# Altium PCB NB3000XN.PcbDoc (part 4 of 71)
Units mil, origin at the board's own origin, x right, y up, seen from the top; angles counter-clockwise.
Board outline 9527.56 x 6929.77 mil, 6 copper layers (Top Layer, GND+SHIELD, MidLayer1, MidLayer2, P2 - 3V3+5V0, Bottom Layer), stack 62.375 mil thick; 832 components, 1027 nets, 4655 pads, 4981 vias.
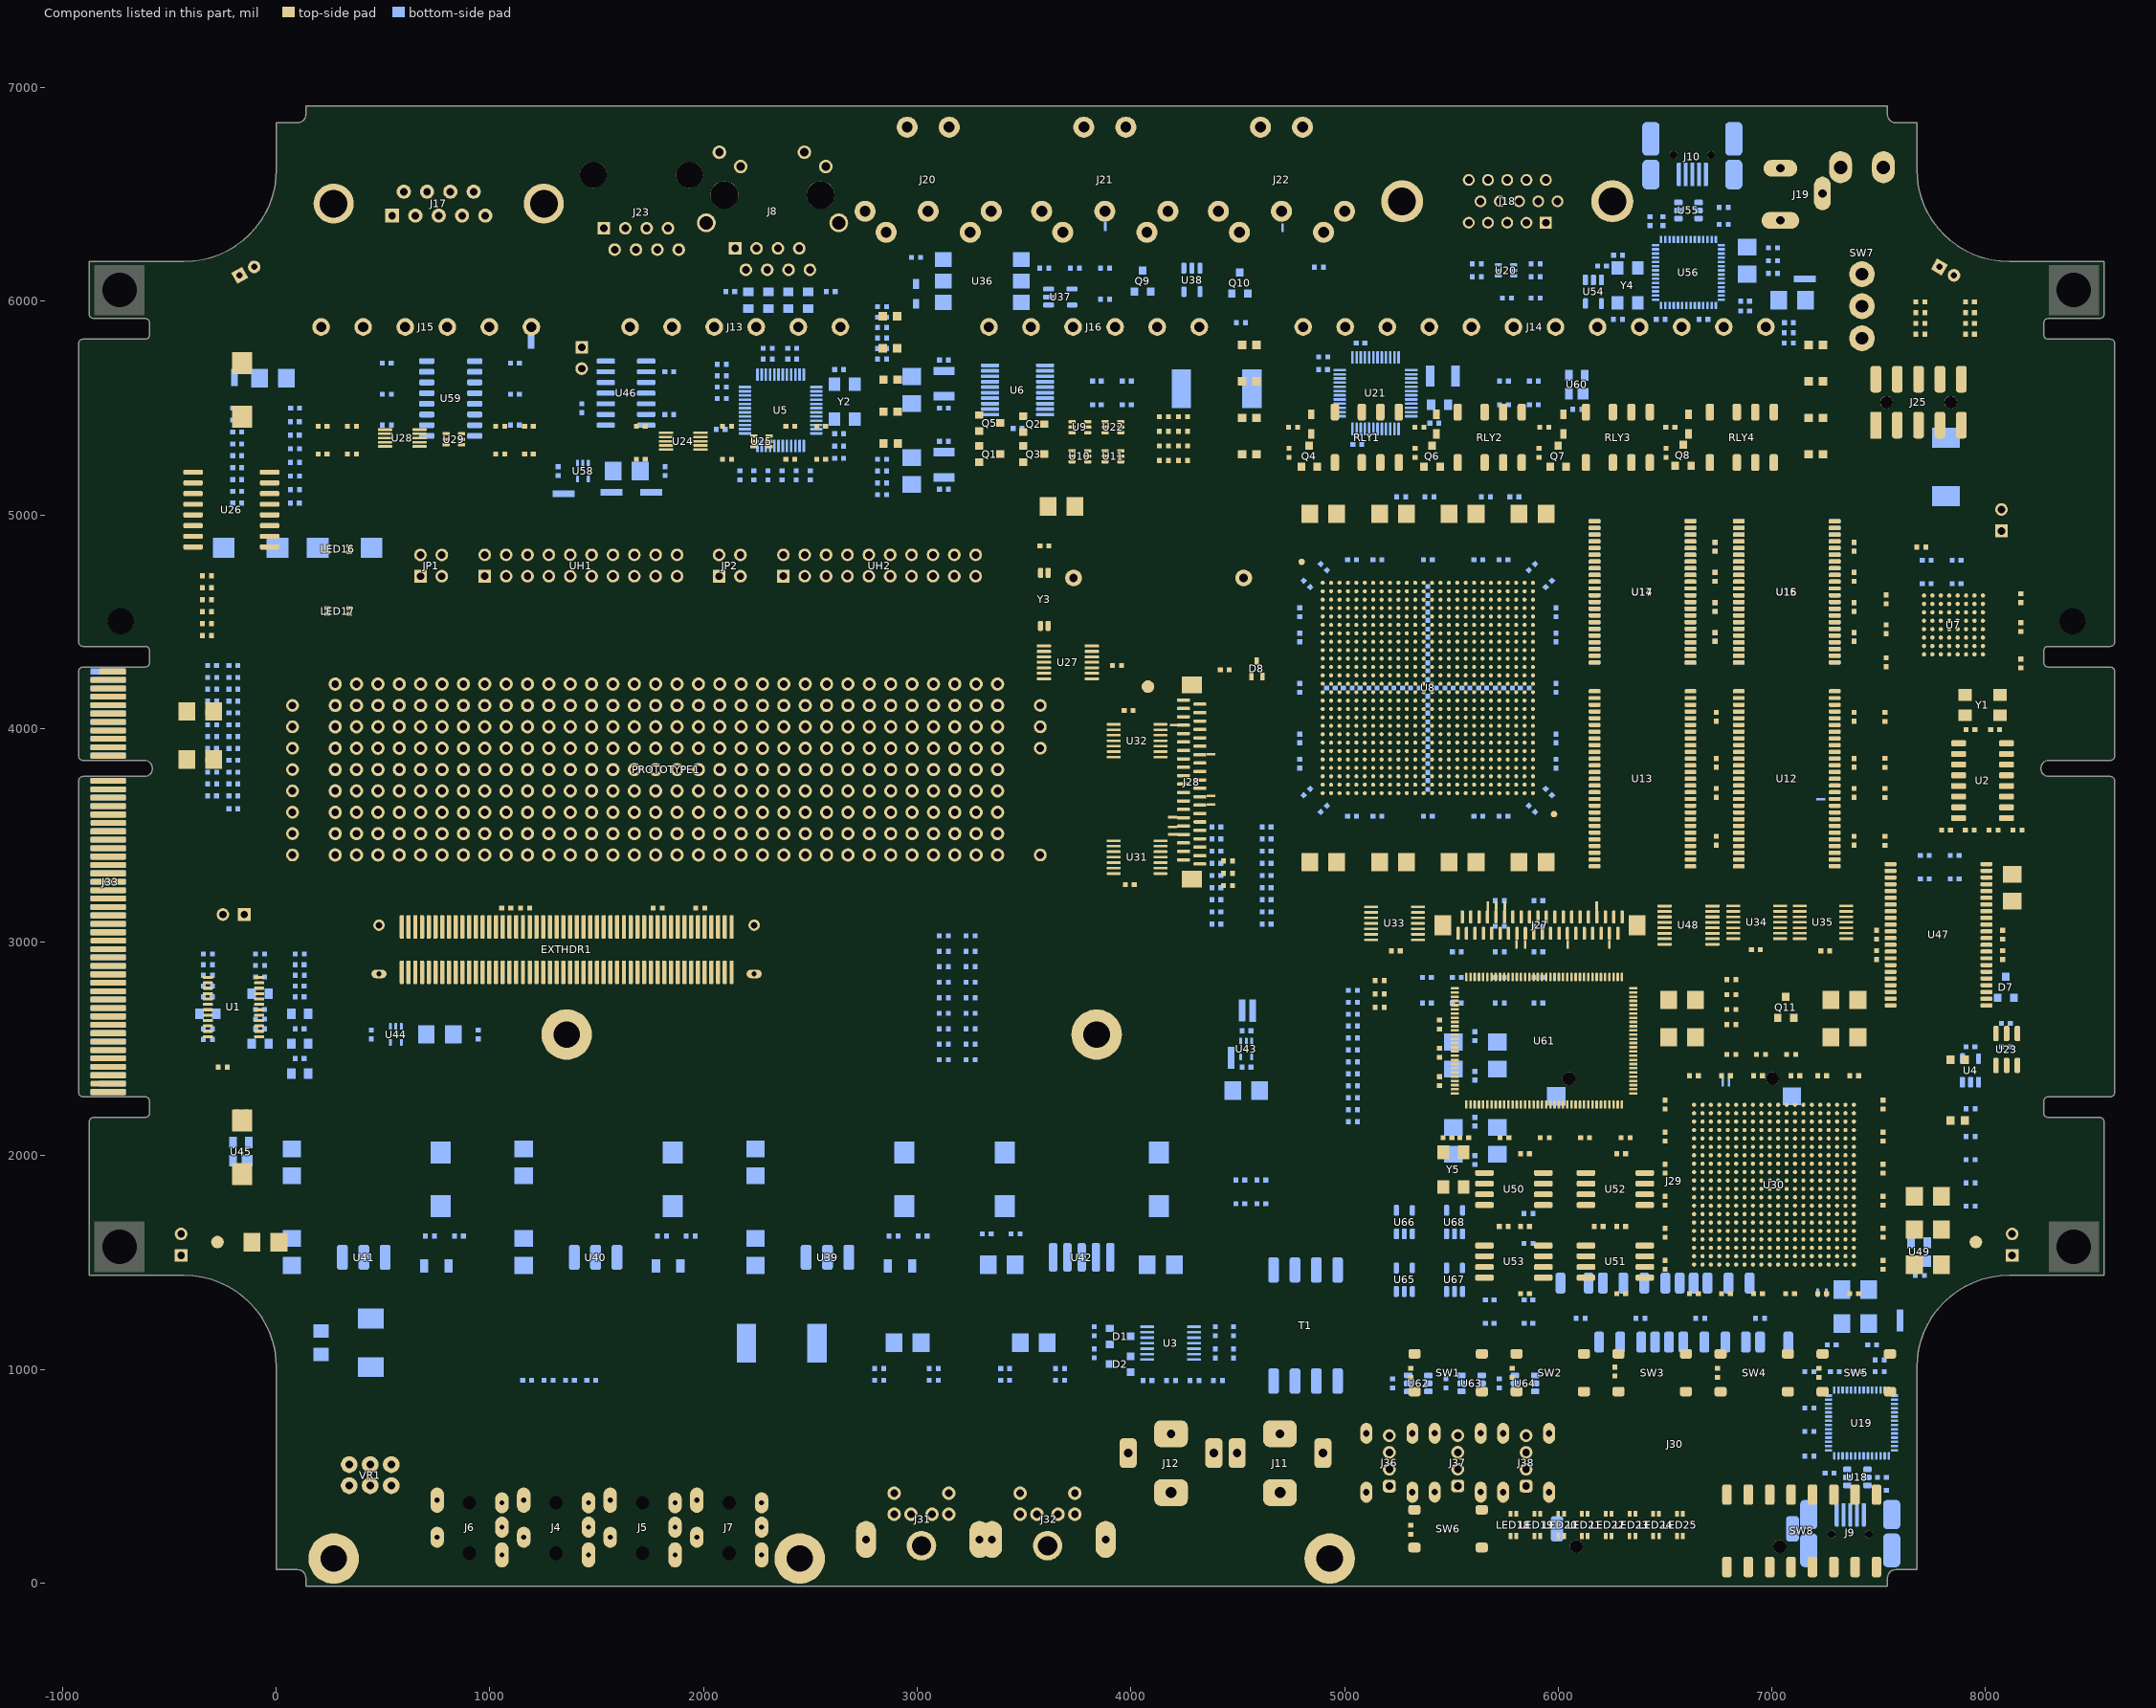
[diagram p8: the components of this part, seen from the top]

## Footprints (in the part's own frame and the unit in brackets; to place one, negate y for a bottom-side part, rotate by r counter-clockwise, add the part's x,y. Pads: shape width x height; smd on the part's side, far side on the other; paste and mask are expansions set on the pad) (continued)
S1204RGBSDJC [mm]
  rect 0.7x0.45 smd paste-1 mask+0: 1(1.313,-0.345)
  rect 0.7x0.45 smd paste-1 mask+0.102: 2(-1.313,-0.353) 3(-1.313,0.345)
  rect 0.7x0.45 smd paste-1: 4(1.313,0.343)
  silkscreen extent -2.19,-0.05 -2.09,0.05, body extent -1.49,-0.46 1.47,0.47, height 1.8
SC70_6L [mm]
  rrect50% 0.4x0.85 smd: 1(0,0) 2(0.65,0) 3(1.3,0) 4(1.3,1.85) 5(0.65,1.85) 6(0,1.85)
  silkscreen extent -0.8,-0.55 1.8,1.85, body extent -0.43,-0.38 1.73,2.22, height 0.64
SOD323 [mil] "SOD-323/SC-76; 2 Leads; Body 1.7 x 1.3 mm, (LxW)"
  rect 45x30 smd: 1(-46.26,0) 2(46.26,0)
  silkscreen extent -37,-30 37,30, body extent -39,-27 38,28, height 20
SOIC8-200-BODY [mm] "SOIC (JEDEC) 8 PIN, 200 mils body width"
  rrect50% 0.7x2.2 smd: 1(0,0) 2(1.27,0) 3(2.54,0) 4(3.81,0) 5(3.81,7) 6(2.54,7) 7(1.27,7) 8(0,7)
  silkscreen extent -1.34,0.54 4.4,5.4, body extent -0.7,0.12 4.71,6.88, height 1.06
SOIC127P600-14N [mm] "SOIC, 14-Leads, Body 8.7x3.9mm, Pitch 1.27mm, IPC Medium Density"
  rrect50% 2.2x0.6 smd: 1(-2.4,3.81) 2(-2.4,2.54) 3(-2.4,1.27) 4(-2.4,0) 5(-2.4,-1.27) 6(-2.4,-2.54) 7(-2.4,-3.81) 8(2.4,-3.81) 9(2.4,-2.54) 10(2.4,-1.27) 11(2.4,0) 12(2.4,1.27) 13(2.4,2.54) 14(2.4,3.81)
  silkscreen extent -2.53,-4.4 0.9,4.78, body extent -2.88,-4.28 2.92,4.28, height 1.75
SOIC127P600-16 [mm]
  rrect50% 0.7x1.8 smd: 1(-4.445,-2.85) 2(-3.175,-2.85) 3(-1.905,-2.85) 4(-0.635,-2.85) 5(0.635,-2.85) 6(1.905,-2.85) 7(3.175,-2.85) 8(4.445,-2.85) 9(4.445,2.85) 10(3.175,2.85) 11(1.905,2.85) 12(0.635,2.85) 13(-0.635,2.85) 14(-1.905,2.85) 15(-3.175,2.85) 16(-4.445,2.85)
  silkscreen extent -5.42,-2.72 5,1.1, body extent -4.9,-2.87 4.9,2.93, height 1.75
SOIC127P1030-16N [mm] "SOIC, 16-Leads, Body 10.3x7.5mm, Pitch 1.27mm, IPC Medium Density"
  rrect50% 2.3x0.6 smd: 1(-4.55,4.445) 2(-4.55,3.175) 3(-4.55,1.905) 4(-4.55,0.635) 5(-4.55,-0.635) 6(-4.55,-1.905) 7(-4.55,-3.175) 8(-4.55,-4.445) 9(4.55,-4.445) 10(4.55,-3.175) 11(4.55,-1.905) 12(4.55,-0.635) 13(4.55,0.635) 14(4.55,1.905) 15(4.55,3.175) 16(4.55,4.445)
  silkscreen extent -4.67,-5.25 3,5.42, body extent -4.9,-5.25 4.89,5.25, height 2.65
SOP65P780-20 [mm]
  rrect50% 0.45x2.15 smd: 1(-2.925,-3.275) 2(-2.275,-3.275) 3(-1.625,-3.275) 4(-0.975,-3.275) 5(-0.325,-3.275) 6(0.325,-3.275) 7(0.975,-3.275) 8(1.625,-3.275) 9(2.275,-3.275) 10(2.925,-3.275) 11(2.925,3.275) 12(2.275,3.275) 13(1.625,3.275) 14(0.975,3.275) 15(0.325,3.275) 16(-0.325,3.275) 17(-0.975,3.275) 18(-1.625,3.275) 19(-2.275,3.275) 20(-2.925,3.275)
  silkscreen extent -3.8,-3.4 3.75,1.8, body extent -3.33,-3.33 3.43,3.28, height 1
SOT65P210X80-5N [mm] "SOT23, 5-Leads, Body 2.0x2.1mm (max), Pitch 0.65mm, IPC Medium Density"
  rrect50% 0.8x0.35 smd: 1(-0.95,0.65) 2(-0.95,0) 3(-0.95,-0.65) 4(0.95,-0.65) 5(0.95,0.65)
  silkscreen extent -1.07,-1 0.15,1.5, body extent -1.02,-0.99 0.9,0.99, height 0.57
SOT95P230-3C [mm] "SOT23, 1=bottom-left, 2=bottom-right, 3=top"
  rect 0.9x0.95 smd: 1(-0.95,-1.25) 2(0.95,-1.25) 3(0,1.25)
  silkscreen extent -1.3,-0.38 1.3,1.25, body extent -1.14,-1.18 1.17,1.44, height 0.38
SOT95P230-3D [mm] "SOT23, 1=bottom-left, 2=top, 3=bottom-right"
  rect 0.9x0.95 smd: 1(-0.95,-1.25) 2(0,1.25) 3(0.95,-1.25)
  silkscreen extent -1.3,-0.38 1.3,1.25, body extent -1.14,-1.25 1.17,1.36, height 0.38
SOT95P280-5 [mm] "SOT-23/SC-74A; 5 Leads; Body 3.1 x 3 mm, inc. leads (LxW max)33"
  rrect50% 0.6x1.3 smd: 1(-0.95,-1.4) 2(0,-1.4) 3(0.95,-1.4) 4(0.95,1.4)
  rrect50% 0.6x1.25 smd: 5(-0.95,1.4)
  silkscreen extent -1.55,-0.9 1.55,0.9, body extent -1.45,-1.45 1.45,1.35, height 0.77
SOT143 [mm] "SOT-143; 4 Leads; Body 3 x 2.6 mm, inc. leads (LxW max)"
  rect 1.35x1.35 smd: 1(-0.75,-1.1)
  rect 0.9x1.35 smd: 2(0.95,-1.1) 3(0.95,1.1) 4(-0.95,1.1)
  silkscreen extent -1.88,-2.22 1.75,0.7, body extent -1.52,-1.5 1.51,1.46, height 0.8
SOT323-3AL [mm] "SOT323, 3-Leads, Body 2.0x1.3mm, Pitch 0.65mm, Lead Span 2.1mm, IPC High Density"
  rect 0.9x0.508 smd: 1(-0.9,0.65) 2(-0.9,-0.65) 3(0.9,0)
  silkscreen extent -1.02,-1.1 0.7,1.57, body extent -0.7,-1.1 0.7,1.1, height 1
SOT425-1 [mm] "LQFP128: plastic low profile quad flat package; 128 leads; body 14 x 20 x 1.4 mm"
  rrect50% 0.305x0.975 smd mask+0.05: 1(0,0) 2(0.5,0) 3(1,0) 4(1.5,0) 5(2,0) 6(2.5,0) 7(3,0) 8(3.5,0) 9(4,0) 10(4.5,0) 11(5,0) 12(5.5,0) 13(6,0) 14(6.5,0) 15(7,0) 16(7.5,0) 17(8,0) 18(8.5,0) 19(9,0) 20(9.5,0) 21(10,0) 22(10.5,0) 23(11,0) 24(11.5,0) 25(12,0) 26(12.5,0) 27(13,0) 28(13.5,0) 29(14,0) 30(14.5,0) 31(15,0) 32(15.5,0) 33(16,0) 34(16.5,0) 35(17,0) 36(17.5,0) 37(18,0) 38(18.5,0) 65(18.5,15.172) 66(18,15.172) 67(17.5,15.172) 68(17,15.172) 69(16.5,15.172) 70(16,15.172) 71(15.5,15.172) 72(15,15.172) 73(14.5,15.172) 74(14,15.172) 75(13.5,15.172) 76(13,15.172) 77(12.5,15.172) 78(12,15.172) 79(11.5,15.172) 80(11,15.172) 81(10.5,15.172) 82(10,15.172) 83(9.5,15.172) 84(9,15.172) 85(8.5,15.172) 86(8,15.172) 87(7.5,15.172) 88(7,15.172) 89(6.5,15.172) 90(6,15.172) 91(5.5,15.172) 92(5,15.172) 93(4.5,15.172) 94(4,15.172) 95(3.5,15.172) 96(3,15.172) 97(2.5,15.172) 98(2,15.172) 99(1.5,15.172) 100(1,15.172) 101(0.5,15.172) 102(0,15.172)
  rrect50% 0.975x0.305 smd mask+0.05: 39(19.861,1.32) 40(19.861,1.82) 41(19.861,2.32) 42(19.861,2.82) 43(19.861,3.32) 44(19.861,3.82) 45(19.861,4.32) 46(19.861,4.82) 47(19.861,5.32) 48(19.861,5.82) 49(19.861,6.32) 50(19.861,6.82) 51(19.861,7.32) 52(19.861,7.82) 53(19.861,8.32) 54(19.861,8.82) 55(19.861,9.32) 56(19.861,9.82) 57(19.861,10.32) 58(19.861,10.82) 59(19.861,11.32) 60(19.861,11.82) 61(19.861,12.32) 62(19.861,12.82) 63(19.861,13.32) 64(19.861,13.82) 103(-1.35,13.82) 104(-1.35,13.32) 105(-1.35,12.82) 106(-1.35,12.32) 107(-1.35,11.82) 108(-1.35,11.32) 109(-1.35,10.82) 110(-1.35,10.32) 111(-1.35,9.82) 112(-1.35,9.32) 113(-1.35,8.82) 114(-1.35,8.32) 115(-1.35,7.82) 116(-1.35,7.32) 117(-1.35,6.82) 118(-1.35,6.32) 119(-1.35,5.82) 120(-1.35,5.32) 121(-1.35,4.82) 122(-1.35,4.32) 123(-1.35,3.82) 124(-1.35,3.32) 125(-1.35,2.82) 126(-1.35,2.32) 127(-1.35,1.82) 128(-1.35,1.32)
  silkscreen extent -0.66,0.68 19.26,14.49, body extent -1.67,-0.34 20.2,15.54, height 1.61
STANDOFF_SOLDER_3MM#1 [mm] "Non-plated hole for 3mm Soldered Standoff"
  round 6 / inner round 5 / far side round 5 hole 3.15 mask+0.1: STAND(0,0)
  Top Layer circle w0.254: c0,0 r3.3
  Top Layer circle w1: c0,0 r2.2
  Bottom Layer lines w0.4: 3.3,3.3 3.3,-3.3 -3.3,-3.3 -3.3,3.3 3.3,3.3
  body extent -2.76,-2.76 2.74,2.74, height 8.5
STANDOFF_SOLDER_3MM#2 [mm] "Non-plated hole for 3mm Soldered Standoff"
  round 6 / inner round 5 / far side round 5 hole 3.15: STAND(0,0)
  Top Layer circle w0.254: c0,0 r3.3
  Top Layer circle w1: c0,0 r2.2
  Bottom Layer lines w0.635: 3.3,3.3 3.3,-3.3 -3.3,-3.3 -3.3,3.3 3.3,3.3
  body extent -2.76,-2.76 2.74,2.74, height 8.5
SW_DTSM-61NT/R [mil] "Switch, Push Button, Thru-Hole; 4 Leads; Body 8.5 x 8.5 mm (LxW typ); Row Spacing 9.0 mm; Pitch 4.5 mm"
  rrect50% 57x45 smd: 1(157.87,-88.58) 2(-157.48,-88.58) 3(157.87,88.19) 4(-157.48,88.19)
  silkscreen extent -124,-124 124,124, body extent -177,-122 177,122, height 177
T8019L-TNQ [mm]
  round 3.048 hole 1.5: 1(0,20.142) 2(0,23.952) 3(0,27.762)
  oval 2.7x3.81 hole 1.6: S1(2.54,7.442) S2(-2.54,7.442)
  silkscreen extent -3.43,0 3.43,26.11, body extent -3.5,-8.38 3.5,28.01, height 13
TESTPIN [mil]
  round 60 hole 35.43: 1(0,0)
  silkscreen extent -41,-39 156,39
TESTPOINT_ARRAY [mil]
  round 62 hole 35.43: 1(0,0) 2(100,0) 3(200,0) 4(300,0) 5(400,0) 6(500,0) 7(600,0) 8(700,0) 9(800,0) 10(900,0) 11(1000,0) 12(1100,0) 13(1200,0) 14(1300,0) 15(1400,0) 16(1500,0) 17(1600,0) 18(1700,0) 19(1800,0) 20(1900,0) 21(2000,0) 22(2100,0) 23(2200,0) 24(2300,0) 25(2400,0) 26(2500,0) 27(2600,0) 28(2700,0) 29(2800,0) 30(2900,0) 31(3000,0) 32(3100,0) A1(0,700) A2(100,700) A3(200,700) A4(300,700) A5(400,700) A6(500,700) A7(600,700) A8(700,700) A9(800,700) A10(900,700) A11(1000,700) A12(1100,700) A13(1200,700) A14(1300,700) A15(1400,700) A16(1500,700) A17(1600,700) A18(1700,700) A19(1800,700) A20(1900,700) A21(2000,700) A22(2100,700) A23(2200,700) A24(2300,700) A25(2400,700) A26(2500,700) A27(2600,700) A28(2700,700) A29(2800,700) A30(2900,700) A31(3000,700) A32(3100,700) B1(0,600) B2(100,600) B3(200,600) B4(300,600) B5(400,600) B6(500,600) B7(600,600) B8(700,600) B9(800,600) B10(900,600) B11(1000,600) B12(1100,600) B13(1200,600) B14(1300,600) B15(1400,600) B16(1500,600) B17(1600,600) B18(1700,600) B19(1800,600) B20(1900,600) B21(2000,600) B22(2100,600) B23(2200,600) B24(2300,600) B25(2400,600) B26(2500,600) B27(2600,600) B28(2700,600) B29(2800,600) B30(2900,600) B31(3000,600) B32(3100,600) C1(0,500) C2(100,500) C3(200,500) C4(300,500) C5(400,500) C6(500,500) C7(600,500) C8(700,500) C9(800,500) C10(900,500) C11(1000,500) C12(1100,500) C13(1200,500) C14(1300,500) C15(1400,500) C16(1500,500) C17(1600,500) C18(1700,500) C19(1800,500) C20(1900,500) C21(2000,500) C22(2100,500) C23(2200,500) C24(2300,500) C25(2400,500) C26(2500,500) C27(2600,500) C28(2700,500) C29(2800,500) C30(2900,500) C31(3000,500) C32(3100,500) D1(0,400) D2(100,400) D3(200,400) D4(300,400) D5(400,400) D6(500,400) D7(600,400) D8(700,400) D9(800,400) D10(900,400) D11(1000,400) D12(1100,400) D13(1200,400) D14(1300,400) D15(1400,400) D16(1500,400) D17(1600,400) D18(1700,400) D19(1800,400) D20(1900,400) D21(2000,400) D22(2100,400) D23(2200,400) D24(2300,400) D25(2400,400) D26(2500,400) D27(2600,400) D28(2700,400) D29(2800,400) D30(2900,400) D31(3000,400) D32(3100,400) E1(0,300) E2(100,300) E3(200,300) E4(300,300) E5(400,300) E6(500,300) E7(600,300) E8(700,300) E9(800,300) E10(900,300) E11(1000,300) E12(1100,300) E13(1200,300) E14(1300,300) E15(1400,300) E16(1500,300) E17(1600,300) E18(1700,300) E19(1800,300) E20(1900,300) E21(2000,300) E22(2100,300) E23(2200,300) E24(2300,300) E25(2400,300) E26(2500,300) E27(2600,300) E28(2700,300) E29(2800,300) E30(2900,300) E31(3000,300) E32(3100,300) F1(0,200) F2(100,200) F3(200,200) F4(300,200) F5(400,200) F6(500,200) F7(600,200) F8(700,200) F9(800,200) F10(900,200) F11(1000,200) F12(1100,200) F13(1200,200) F14(1300,200) F15(1400,200) F16(1500,200) F17(1600,200) F18(1700,200) F19(1800,200) F20(1900,200) F21(2000,200) F22(2100,200) F23(2200,200) F24(2300,200) F25(2400,200) F26(2500,200) F27(2600,200) F28(2700,200) F29(2800,200) F30(2900,200) F31(3000,200) F32(3100,200) G1(0,100) G2(100,100) G3(200,100) G4(300,100) G5(400,100) G6(500,100) G7(600,100) G8(700,100) G9(800,100) G10(900,100) G11(1000,100) G12(1100,100) G13(1200,100) G14(1300,100) G15(1400,100) G16(1500,100) G17(1600,100) G18(1700,100) G19(1800,100) G20(1900,100) G21(2000,100) G22(2100,100) G23(2200,100) G24(2300,100) G25(2400,100) G26(2500,100) G27(2600,100) G28(2700,100) G29(2800,100) G30(2900,100) G31(3000,100) G32(3100,100) H1(0,800) H2(100,800) H3(200,800) H4(300,800) H5(400,800) H6(500,800) H7(600,800) H8(700,800) H9(800,800) H10(900,800) H11(1000,800) H12(1100,800) H13(1200,800) H14(1300,800) H15(1400,800) H16(1500,800) H17(1600,800) H18(1700,800) H19(1800,800) H20(1900,800) H21(2000,800) H22(2100,800) H23(2200,800) H24(2300,800) H25(2400,800) H26(2500,800) H27(2600,800) H28(2700,800) H29(2800,800) H30(2900,800) H31(3000,800) H32(3100,800)
  silkscreen extent -136,-149 3234,958
TO254P-3N [mm] "D2-PAK, 3-Pads, IPC Medium Density"
  rrect50% 3x1.3 smd: 1(-6.35,2.54) 2(-6.35,0) 3(-6.35,-2.54)
  Top Layer region: 9.253,5.949 9.253,-6.051 -4.639,-6.051 -4.639,5.949
  silkscreen extent -8.73,-6.05 9.27,5.95, body extent -7.34,-5.09 8.1,5.08, height 2.53
TO-263-2 [mm]
  rrect50% 1x3.4 smd: 1(-3.4,0) 2(-1.7,0) 3(0,0) 4(1.7,0) 5(3.4,0)
  Top Layer region: -5.949,15.619 6.051,15.619 6.051,2.032 -5.949,2.032
  silkscreen extent -5.95,-2.38 6.05,15.62, body extent -5.11,-0.87 5.05,13.77, height 4.57
TRC-005 [mm] "RCA Phono Jack, Right Angle, Thru-Hole, Body 20.8 x 9.8 x 11 mm (LxWxH)"
  rrect50% 3.2x4 hole 1.3 slot 2.5 at 90 deg: 1(-7,0)
  rrect50% 3.556x2.032 hole 1 slot 2.5 at 0 deg: 2(-2.3,5.1) 3(-2.3,-5.1)
  rrect50% 3.2x4 hole 1 slot 2.5 at 90 deg: 4(0,0)
  silkscreen extent -20.05,-4.9 0.75,4.9, body extent -20.02,-5.26 0.48,5.52, height 13.58
TSH-3675 [mm]
  oval 3x1.6 hole 0.6 slot 2 at 0 deg: 1(-0.2,3.85) 2(6.3,-3.85)
  oval 2.5x1.6 hole 0.6 slot 1.5 at 0 deg: 3(6,3.85) 10(1.9,-3.85) 11(3.1,3.85)
  round 1.3 hole 1.6 unplated: 12(6,0) 13(0,0)
  silkscreen extent -6,-4.75 9,4.75, body extent -5.97,-4.72 9.02,4.78, height 5
TSM-105-01-DV [mil] "SMT 100mil space smt pin header"
  rect 50x125 smd: 1(0,-215)
  rrect50% 50x125 smd: 2(0,0) 3(100,-215) 4(100,0) 5(200,-215) 6(200,0) 7(300,-215) 8(300,0) 9(400,-215) 10(400,0)
  round 59.05 hole 59.06 unplated mask+1.5: PEGA(50,-108) PEGB(350,-108)
  silkscreen extent -35,-287 435,73, body extent -52,-253 448,37, height 10
TSOP65P640-14AN [mm] "TSOP, 14-Leads, Body 5x4.4mm, Pitch 0.65mm, IPC Medium Density"
  rrect50% 1.7x0.35 smd: 1(-2.85,1.95) 2(-2.85,1.3) 3(-2.85,0.65) 4(-2.85,0) 5(-2.85,-0.65) 6(-2.85,-1.3) 7(-2.85,-1.95) 8(2.85,-1.95) 9(2.85,-1.3) 10(2.85,-0.65) 11(2.85,0) 12(2.85,0.65) 13(2.85,1.3) 14(2.85,1.95)
  silkscreen extent -2.97,-2.55 1.6,2.8, body extent -3.05,-2.53 3.34,2.47, height 0.64
TSOP65P640-16AN [mm] "TSOP, 16-Leads, Body 5x4.4mm, Pitch 0.65mm, IPC Medium Density"
  rrect50% 1.7x0.35 smd: 1(-2.85,2.275) 2(-2.85,1.625) 3(-2.85,0.975) 4(-2.85,0.325) 5(-2.85,-0.325) 6(-2.85,-0.975) 7(-2.85,-1.625) 8(-2.85,-2.275) 9(2.85,-2.275) 10(2.85,-1.625) 11(2.85,-0.975) 12(2.85,-0.325) 13(2.85,0.325) 14(2.85,0.975) 15(2.85,1.625) 16(2.85,2.275)
  silkscreen extent -2.97,-2.55 1.6,3.12, body extent -3.3,-2.38 3.37,2.77, height 0.64
TSOP80P1176-44 [mm]
  rrect50% 0.508x1.4 smd: 1(-8.4,-5.7) 2(-7.6,-5.7) 3(-6.8,-5.7) 4(-6,-5.7) 5(-5.2,-5.7) 6(-4.4,-5.7) 7(-3.6,-5.7) 8(-2.8,-5.7) 9(-2,-5.7) 10(-1.2,-5.7) 11(-0.4,-5.7) 12(0.4,-5.7) 13(1.2,-5.7) 14(2,-5.7) 15(2.8,-5.7) 16(3.6,-5.7) 17(4.4,-5.7) 18(5.2,-5.7) 19(6,-5.7) 20(6.8,-5.7) 21(7.6,-5.7) 22(8.4,-5.7) 23(8.4,5.7) 24(7.6,5.7) 25(6.8,5.7) 26(6,5.7) 27(5.2,5.7) 28(4.4,5.7) 29(3.6,5.7) 30(2.8,5.7) 31(2,5.7) 32(1.2,5.7) 33(0.4,5.7) 34(-0.4,5.7) 35(-1.2,5.7) 36(-2,5.7) 37(-2.8,5.7) 38(-3.6,5.7) 39(-4.4,5.7) 40(-5.2,5.7) 41(-6,5.7) 42(-6.8,5.7) 43(-7.6,5.7) 44(-8.4,5.7)
  silkscreen extent -9.29,-5.7 9.26,4.45, body extent -9.24,-5.95 9.26,5.84, height 1
TSOP80P1176-54 [mm] "Plastic Small Outline; 54 Leads; Body Width 10.16 mm"
  rrect50% 0.508x1.4 smd: 1(-10.4,-5.7) 2(-9.6,-5.7) 3(-8.8,-5.7) 4(-8,-5.7) 5(-7.2,-5.7) 6(-6.4,-5.7) 7(-5.6,-5.7) 8(-4.8,-5.7) 9(-4,-5.7) 10(-3.2,-5.7) 11(-2.4,-5.7) 12(-1.6,-5.7) 13(-0.8,-5.7) 14(0,-5.7) 15(0.8,-5.7) 16(1.6,-5.7) 17(2.4,-5.7) 18(3.2,-5.7) 19(4,-5.7) 20(4.8,-5.7) 21(5.6,-5.7) 22(6.4,-5.7) 23(7.2,-5.7) 24(8,-5.7) 25(8.8,-5.7) 26(9.6,-5.7) 27(10.4,-5.7) 28(10.4,5.7) 29(9.6,5.7) 30(8.8,5.7) 31(8,5.7) 32(7.2,5.7) 33(6.4,5.7) 34(5.6,5.7) 35(4.8,5.7) 36(4,5.7) 37(3.2,5.7) 38(2.4,5.7) 39(1.6,5.7) 40(0.8,5.7) 41(0,5.7) 42(-0.8,5.7) 43(-1.6,5.7) 44(-2.4,5.7) 45(-3.2,5.7) 46(-4,5.7) 47(-4.8,5.7) 48(-5.6,5.7) 49(-6.4,5.7) 50(-7.2,5.7) 51(-8,5.7) 52(-8.8,5.7) 53(-9.6,5.7) 54(-10.4,5.7)
  silkscreen extent -11.33,-5.67 11.15,4.4, body extent -11.23,-5.96 11.19,5.97, height 1
TSOP95P275-6 [mm]
  rrect50% 0.7x1 smd: 1(-0.95,-1.2) 2(0,-1.2) 3(0.95,-1.2) 4(0.95,1.2) 5(0,1.2) 6(-0.95,1.2)
  silkscreen extent -1.87,-1.32 1.5,0.7, body extent -1.49,-1.3 1.51,1.3, height 0.8
TSQFP50P900X900-48 [mm]
  rrect50% 1.5x0.305 smd: 1(-4.25,2.75) 2(-4.25,2.25) 3(-4.25,1.75) 4(-4.25,1.25) 5(-4.25,0.75) 6(-4.25,0.25) 7(-4.25,-0.25) 8(-4.25,-0.75) 9(-4.25,-1.25) 10(-4.25,-1.75) 11(-4.25,-2.25) 12(-4.25,-2.75) 25(4.25,-2.75) 26(4.25,-2.25) 27(4.25,-1.75) 28(4.25,-1.25) 29(4.25,-0.75) 30(4.25,-0.25) 31(4.25,0.25) 32(4.25,0.75) 33(4.25,1.25) 34(4.25,1.75) 35(4.25,2.25) 36(4.25,2.75)
  rrect50% 0.305x1.5 smd: 13(-2.75,-4.25) 14(-2.25,-4.25) 15(-1.75,-4.25) 16(-1.25,-4.25) 17(-0.75,-4.25) 18(-0.25,-4.25) 19(0.25,-4.25) 20(0.75,-4.25) 21(1.25,-4.25) 22(1.75,-4.25) 23(2.25,-4.25) 24(2.75,-4.25) 37(2.75,4.25) 38(2.25,4.25) 39(1.75,4.25) 40(1.25,4.25) 41(0.75,4.25) 42(0.25,4.25) 43(-0.25,4.25) 44(-0.75,4.25) 45(-1.25,4.25) 46(-1.75,4.25) 47(-2.25,4.25) 48(-2.75,4.25)
  silkscreen extent -4.75,-4 4,4, body extent -4.04,-4.14 4.01,4.24, height 0.85
TSQFP50P900X900_HS-48 [mm]
  rrect50% 1.5x0.305 smd: 1(-4.25,2.75) 2(-4.25,2.25) 3(-4.25,1.75) 4(-4.25,1.25) 5(-4.25,0.75) 6(-4.25,0.25) 7(-4.25,-0.25) 8(-4.25,-0.75) 9(-4.25,-1.25) 10(-4.25,-1.75) 11(-4.25,-2.25) 12(-4.25,-2.75) 25(4.25,-2.75) 26(4.25,-2.25) 27(4.25,-1.75) 28(4.25,-1.25) 29(4.25,-0.75) 30(4.25,-0.25) 31(4.25,0.25) 32(4.25,0.75) 33(4.25,1.25) 34(4.25,1.75) 35(4.25,2.25) 36(4.25,2.75)
  rrect50% 0.305x1.5 smd: 13(-2.75,-4.25) 14(-2.25,-4.25) 15(-1.75,-4.25) 16(-1.25,-4.25) 17(-0.75,-4.25) 18(-0.25,-4.25) 19(0.25,-4.25) 20(0.75,-4.25) 21(1.25,-4.25) 22(1.75,-4.25) 23(2.25,-4.25) 24(2.75,-4.25) 37(2.75,4.25) 38(2.25,4.25) 39(1.75,4.25) 40(1.25,4.25) 41(0.75,4.25) 42(0.25,4.25) 43(-0.25,4.25) 44(-0.75,4.25) 45(-1.25,4.25) 46(-1.75,4.25) 47(-2.25,4.25) 48(-2.75,4.25)
  Top Layer region: -2.25,2.25 2.25,2.25 2.25,-2.25 -2.25,-2.25
  silkscreen extent -4.75,-4 4,4, body extent -4.07,-4.14 3.98,4.24, height 0.8
TSSOP14 [mm]
  rrect50% 1.65x0.305 smd: 1(0,0) 2(0,-0.65) 3(0,-1.3) 4(0,-1.95) 5(0,-2.6) 6(0,-3.25) 7(0,-3.9) 8(5.55,-3.9) 9(5.55,-3.25) 10(5.55,-2.6) 11(5.55,-1.95) 12(5.55,-1.3) 13(5.55,-0.65) 14(5.55,0)
  silkscreen extent 0.52,-4.19 4.37,0.7, body extent -0.4,-4.49 6,0.61, height 1.19
TSSOP50P490-10AN [mm] "TSSOP, 10-Leads, Body 3x3mm, Pitch 0.5mm, IPC Medium Density"
  rrect50% 1.7x0.305 smd: 1(-2.05,1) 2(-2.05,0.5) 3(-2.05,0) 4(-2.05,-0.5) 5(-2.05,-1) 6(2.05,-1) 7(2.05,-0.5) 8(2.05,0) 9(2.05,0.5) 10(2.05,1)
  silkscreen extent -2.17,-1.6 0.8,1.82, body extent -2.4,-1.6 2.4,1.6, height 1.1
TSSOP-24 [mm]
  rrect50% 0.36x1.18 smd mask+0.051: 1(0,0) 2(0.64,0) 3(1.28,0) 4(1.92,0) 5(2.56,0) 6(3.2,0) 7(3.84,0) 8(4.48,0) 9(5.12,0) 10(5.76,0) 11(6.4,0) 12(7.04,0) 13(7.04,6.1) 14(6.4,6.1) 15(5.76,6.1) 16(5.12,6.1) 17(4.48,6.1) 18(3.84,6.1) 19(3.2,6.1) 20(2.56,6.1) 21(1.92,6.1) 22(1.28,6.1) 23(0.64,6.1) 24(0,6.1)
  silkscreen extent -0.17,1.37 7.12,4.9, body extent -0.3,0.02 7.25,6.36, height 0.9
XTAL-200X126-4 [mil] "CRYSTAL SMD 200x126x44 mils, 4 pads"
  rect 63x55 smd: 1(-81.5,-47.5) 2(81.5,-47.5) 3(81.5,47.5) 4(-81.5,47.5)
  silkscreen extent -30,-72 30,72, body extent -114,-52 113,51, height 39

## Part data
"Altium Logo BOT1": library part D-000-0003, "Altium Logo for PCB"
BT1: library part D-302-0000, "Lithium Battery Holder for CR2032 3V Cell"
C1 C2 C106 C107 C129 C133 C137 C138 C141: library part D-101-0088, "Capacitor, Tantalum, 220uF 10% 10V MCCT-D (7343-31)"
C3 C4 C36 C40 C49 C61 C62 C89 C93 C111 C115 C126 C128 C130 C132 C134 C136 C139 C140 C143 C146 C171 C175 C182 C184 C185 C189 C190 C191 C200 C201 C202 C203 C260 C265 C266 C267 C276 C277 C278 C279 C340 C341 C342: library part D-101-0007, "Capacitor, Tantalum, 10uF 10% 20V MCCT-B (3528)"
C5 C6 C8 C9 C10 C11 C12 C14 C15 C16 C17 C108 C109 C110 C121 C122 C123 C124 C125 C142 C144 C145 C147 C152 C181 C183: library part D-101-0131, "Capacitor, Ceramic, 1uF 10% 10V 0402 (1005) X5R"
C7 C13 C18: library part D-101-0132, "Capacitor, Ceramic, 4.7nF 10% 10V 0402 (1005) X7R"
C19 C20 C23 C25 C27 C31 C99: library part D-101-0087, "Capacitor, Ceramic, 10uF 10% 10V 0805 (2012) X5R"
C21 C22 C24 C26: library part D-101-0062, "Capacitor, Ceramic, 100nF 10% 16V 0402 (1005) X7R"
C28 C32: library part D-101-0064, "Capacitor, Ceramic, 220pF 5% 50V 0402 (1005) COG"
C29 C30 C57 C58 C59 C67 C68 C69 C70 C73 C74 C77 C78 C83 C84 C85 C86 C155 C156 C158 C160 C162 C164 C196 C197 C198 C199 C231 C232 C233 C234 C235 C236 C237 C238 C239 C240 C241 C242 C243 C244 C245 C246 C248 C250 C251 C253 C254 C256 C258 C272 C273 C274 C275 C307 C308 C309 C310 C311 C312 C313 C314 C315 C316 C317 C318 C319 C320 C321 C322 C324 C326 C327 C329 C330 C332 C334: library part D-101-0077, "Capacitor, Ceramic, 10nF 10% 16V 0402 (1005) X7R"
C33 C34: library part D-101-0075, "Capacitor, Ceramic, 15pF 5% 50V 0402 (1005)"
C35 C37 C38 C39 C55 C56 C60 C63 C64 C65 C66 C71 C72 C75 C76 C79 C80 C81 C82 C88 C90 C91 C92 C94 C95 C96 C97 C98 C100 C105 C112 C113 C114 C116 C148 C149 C150 C151 C153 C154 C159 C161 C163 C165 C168 C170 C172 C173 C174 C176 C177 C187 C192 C193 C194 C195 C215 C216 C217 C218 C219 C220 C221 C222 C223 C224 C225 C226 C227 C228 C229 C247 C249 C252 C255 C257 C259 C268 C269 C270 C271 C291 C292 C293 C294 C295 C296 C297 C298 C299 C300 C301 C302 C303 C304 C305 C323 C325 C328 C331 C333 C335 C336 C337 C338 C339: library part D-101-0080, "Capacitor, Ceramic, 0.1uF 10% 16V 0402 (1005) X7R"
C41 C42 C43 C44 C47 C48 C50 C51 C52 C53 C54: library part D-101-0045, "Capacitor, Ceramic, 0.1uF 25V 0402 (1005)"
C45 C46 C157 C166 C167 C169: library part D-101-0059, "Capacitor, Ceramic, 22pF 5% 50V 0402 (1005) COG"
C87: library part D-101-0019, "Capacitor, Ceramic, 4.7nF 20% 250V Panasonic BC J Lead (CAPM7163) Y5V"
C101 C102 C103 C104 C117 C118 C119 C120: library part D-101-0133, "Capacitor, Ceramic, 33nF 10% 25V 0402 (1005) X7R"
C127 C131 C135: library part D-101-0027, "Capacitor, Ceramic, 1uF 10% 25V 1206 (3216) X7R"
C186: library part D-101-0116, "Capacitor, Ceramic, 220nF 10% 16V 0402 (1005) X5R"
D1 D2: library part D-151-0002, "Schottky Diode, BAT54 30V 200mA 30V SOT-23"
D3 D4 D5 D6 D9: library part D-151-0004, "Schottky Diode, 400mA"
D7: library part D-150-0005, "Zener Diode, 3.3V"
D8: library part D-155-0001, "BAT54CW, SOT-323 Plastic-Encapsulated Diode"
D10: library part D-150-0001, "Zener Diode, 5V 5W"
EXTHDR1: library part D-300-0026, "Connector, Molex Docking Station 100 Pin Female 53751"
F1 F2: library part D-106-0000, "Mutifuse, SMD 5A"
FD1 FD2 FD3: library part D-004-0001, "Fiducial - Round 1.5mm Top-Bottom"
J1 J2 J3 J24 J26: library part D-300-0020, "Header IDC, 2 x 1 Pin Vertical 2.54mm Pitch (Non-Boxed, Male)"
J4 J7: library part D-300-0033, "Connector, 3.5mm Stereo Audio Socket, Black, 2 break contacts (normals) and 2 auxiliary make contacts"
J5: library part D-300-0031, "Connector, 3.5mm Stereo Audio Socket, Green, 2 break contacts (normals) and 2 auxiliary make contacts"
J6: library part D-300-0032, "Connector, 3.5mm Stereo Audio Socket, Blue, 2 break contacts (normals) and 2 auxiliary make contacts"
J8: library part D-300-0119, "Socket, 1x1 Tab-DOWN R/A 8-Way RJ45"
J9 J10: library part D-300-0009, "USB, MINI, SMD,  Molex"
J11 J12: library part CON-RCA-RA, "Connector, TRC-005-4 , Black RCA Phono Jack, Right Angle, Thru-Hole, Snap-In"
J13 J15 J16: library part D-300-0122, "Socket, Screw Terminal Block, 6 Way, 5.0mm pitch, 45 degree angle, Through-hole"
J14: library part D-300-0123, "Socket, Screw Terminal Block, 12 Way, 5.0mm pitch, 45 degree angle, Through-hole"
J17: library part D-300-0120, "Connector, DB9 R/A Through-hole Male"
J18: library part D-300-0121, "Socket, High-Density DB15 (HD15) R/A Female Through-hole"
J19: library part D-300-0007, "Connector, 3 Conductor Power Jack 2 break 2 aux contacts"
J20 J21 J22: library part D-300-0118, "Socket, 5-way R/A DIN"
J23: library part D-300-0117, "Socket, PC Jack 8-Way, R/A Low-profile"
J25: library part D-300-0076, "Non-Boxed Header IDC, 2 X 5 Pin SMD"
J27 J28: library part D-300-0125, "Header FFC, 2x20 pin Vertical, 0.5mm"
J29 J30: library part D-300-0126, "Secure Digital Card Socket"
J31 J32: library part D-300-0124, "MINI DIN R/A F/SHLD 6P GOLD PLATED; Black"
J33: library part D-300-0115, "Connector, PCI Express, Used for Automatic Test Equipment (ATE)"
J34 J35: library part D-300-0131, "PH Series 2 x 1 Pin Vertical 2.0mm Pitch (Male)"
J36 J37 J38: library part D-300-0127, "CONNECTOR USB RT ANG RECEPT TYPE A"
JP1 JP2: library part D-300-0019, "Header IDC, 2 x 2 Pin Vertical 2.54mm Pitch (Non-Boxed, Male)"
L1 L2: library part D-102-0006, "Inductor, Coil 22uH  1210 (3225) LQH32CN220K21L"
L3: library part D-102-0005, "Inductor, 4.7uH 650mA 0.15R 1210 (3225) LQH32CN4R7M11L"
LED1 LED3 LED4: library part D-153-0002
LED2 LED5 LED8 LED9 LED10 LED12: library part D-153-0007
LED6 LED11 LED13 LED14 LED15: library part D-153-0006
LED7: library part D-153-0009, "LED, Red 0603 (1608) 63mCd"
LED16 LED17 LED18 LED19 LED20 LED21 LED22 LED23 LED24 LED25: library part D-153-0020, "SASEN LED, RGB, SMD"
LOGO1: library part D-000-0000
NT1 NT11: library part D-002-0004, "Net-Tie, Surface Mount, 2 x 2.0mm x 0.8mm SMT Pads - For 0.8mm Track"
NT4 NT5 NT6 NT7 NT46 NT47 NT48: library part D-002-0002, "Net-Tie, Surface Mount, 2 x 0.4mm x 0.2mm SMT Pads - For 0.2mm Track"
NT10 NT17 NT18 NT19 NT26 NT27 NT28 NT29 NT30 NT31 NT33 NT34 NT35 NT36 NT37 NT38 NT39 NT40 NT41 NT42 NT43 NT44 NT45: library part D-002-0003, "Net-Tie, Surface Mount, 2 x 1.6mm x 0.8mm SMT Pads - For 0.8mm Track"
PB_MH1 PB_MH2 PB_MH3 PB_MH4 PB_MH5: library part D-306-0001, "Spacer, 8.5mm GOLD, Splitted bottom, Female M3-thread"
PCB1: library part D-810-0050, "NB2STR01 Blank PCB - NanoBoard  Starter kit"
PROTOTYPE1: library part D-006-0002, "Test Point Array"
Q1 Q2 Q3 Q5 Q11: library part D-158-0005, "N-channel Enhancement Mode Field-effect Transistor;  5.8A/30V"
Q4 Q6 Q7 Q8 Q9 Q10: library part D-158-0002, "N-channel Enhancement Mode Field-effect Transistor"
R1 R14: library part D-100-0098, "Resistor, 3K3 1% 0402 (1005)"
R2 R5 R6 R7 R10 R11 R12 R13 R15 R21 R35 R38 R110 R137 R138 R208 R247 R260 R272 R273 R274 R275 R276: library part D-100-0130, "Resistor, 10K 1% 0402 (1005)"
R3 R4 R215: library part D-100-0092, "Resistor, 47K 1% 0402 (1005)"
R8: library part D-100-0114, "Resistor, 22K 1% 0402 (1005)"
R9 R141 R142: library part D-100-0132, "Resistor, 100K 1% 0402 (1005)"
R16 R17 R18 R19 R20 R33: library part D-100-0102, "Resistor, 33R 1% 0402 (1005)"
R22 R25 R26 R27 R41 R42 R43 R44 R45 R46 R47 R50 R51 R52 R57 R59 R60 R61 R64 R65 R70 R73 R76 R77 R82 R83 R86 R87 R98 R102 R103 R104 R105 R106 R107 R113 R114 R115 R131 R148 R154 R161 R162 R163 R216 R217 R218 R219 R224 R225 R226 R227 R232 R236 R237 R238 R239 R240 R241 R242 R243 R248 R250 R251 R252 R253 R254 R255 R256 R271 R277 R278 R279 R280 R281 R282 R283: library part D-100-0088, "Resistor, 4K7 1% 0402 (1005)"
R23 R24 R116: library part D-100-0096, "Resistor, 430R 1% 0402 (1005)"
R28 R29 R100 R101 R153: library part D-100-0085, "Resistor, 5R6 1% 0402 (1005)"
R30 R53 R56 R91 R93 R95 R97 R124 R126 R128 R130 R139 R140 R143 R144: library part D-100-0121, "Resistor, 1K 1% 0402 (1005)"
R31 R32 R96 R125 R127 R129 R198 R200 R201 R203 R204 R205 R212 R214: library part D-100-0126, "Resistor, 120R 1% 0402 (1005)"
R34 R36: library part D-100-0001, "Resistor, 75R 1% 0402"
R37 R68 R69 R71 R72 R74 R75 R78 R79 R80 R81 R84 R85 R88 R89 R147 R209 R210 R211 R220 R221 R222 R223 R228 R229 R230 R231 R233 R267 R268 R269 R270: library part D-100-0131, "Resistor, 100R 1% 0402 (1005)"
R39 R40: library part D-100-0111, "Resistor, 270R 1% 0402 (1005)"
R48 R49 R54 R55: library part D-100-0017, "Resistor, 49R9 1% 0805 (2012)"
R58 R62 R63 R66 R67 R132 R195: library part D-100-0093, "Resistor, 470R 1% 0402 (1005)"
R90 R92 R94 R112 R123 R133 R134 R135 R136 R149 R150 R151 R152 R196 R244 R249: library part D-100-0108, "Resistor, 27R 1% 0402 (1005)"
R99 R145 R146 R155 R156 R157 R158 R159 R160 R234 R235 R264 R265 R266: library part D-100-0107, "Resistor, 2K2 1% 0402 (1005)"
R108 R245: library part D-100-0105, "Resistor, 2K7 1% 0402 (1005)"
R109 R246: library part D-100-0086, "Resistor, 5K6 1% 0402 (1005)"
R111: library part D-100-0059, "Resistor, 10M 1%1206 (3216)"
R117 R118 R119 R120 R121 R122 R164 R165 R166 R167 R168 R169 R170 R171 R172 R173 R174 R175 R176 R177 R178 R179 R180 R181 R182 R183 R184 R185 R186 R187 R188 R189 R190 R191 R192 R193 R261 R262 R263: library part D-100-0005, "Resistor, 150R 1% 0402 (1005)"
R194 R197 R199: library part D-100-0115, "Resistor, 220R 1% 0402 (1005)"
R202: library part D-100-0174, "Resistor, 56R 1% 0402"
R206: library part D-100-0116, "Resistor, 200R 1% 0402 (1005)"
R207: library part D-100-0137, "Resistor, 0R 5% 0402 (1005)"
R257 R258 R259: library part D-100-0002, "Resistor, 12K 1% 0402"
RLY1 RLY2 RLY3 RLY4: library part D-313-0001, "Relay, Tyco IM03GR"
SW1 SW2 SW3 SW4 SW5 SW6: library part D-301-0001, "Switch, SPNO Push Button SMD"
SW7: library part D-301-0000, "Switch, SPDT Subminiature Toggle"
SW8: library part D-301-0018, "Switch, SPST, Surface Mount DIP, 8-way"
T1: library part D-107-0004, "Transformer, 1:1, SMD, 0 to 70 deg C,  1 to 7 Mbps, 500Vrms min"
TP1 TP2 TP3 TP4 TP5 TP6 TP7 TP8 TP9 TP10 TP11 TP12: library part D-006-0000, "Test Point, PCB Mount with Silkscreen Box"
U1: library part D-201-0003, "CS4270; 24-Bit, 192 kHz Stereo Audio CODEC"
U2: library part D-206-0000, "ICS307-02, SPI Programmable Clock Generator"
U3: library part D-205-0010, "74HCU04, HEX Inverter, Unbuffered"
U4 U37 U38 U54 U65 U66 U67 U68: library part D-205-0001, "SN74LVC1G04DBV, Single Inverter Gate, 1.65-V to 5.5-V"
U5: library part D-221-0000, "RTL8201CL-VD, Single-Chip/Single-Port 10/100 Fast Ethernet Phyceiver"
U6: library part D-205-0000, "SN74LVC244ADBR,  Octal Buffer/Driver with 3-State Outputs, 2.0V - 3.6V"
U7: library part D-262-0008, "IC Flash, S29GL128P11FFI010 128 Megabit 3.0V Page Mode Flash Memory"
U8: library part D-241-0015, "FPGA, Xilinx Spartan 3AN-1400 FG676"
U9 U10 U11 U20 U22 U25 U29: library part D-157-0000, "TVS Diode Array  For ESD and Latch-Up Protection"
U12 U13: library part D-261-0000, "MT48LC16M16A2TG, 256 Mbit High-Speed CMOS SDRAM, 16Mb x 16Bit x 4 Banks, TSOP54"
U14 U15 U16 U17 U47: library part D-260-0000, "K6R4016V1D-TC10T, 256K x 16-Bit SRAM, TSOP44"
U18 U55 U62 U63 U64: library part D-204-0001, "NUP2201MR6, Low Capacitance Diode Array, USB Protection"
U19 U56: library part D-221-0004, "CY7C68001-56LFC, EZ-USB SX2 High-Speed USB Interface"
U21: library part D-222-0000, "THS8134BCPHP, Triple 8-Bit, 80 MSPS Video DAC with Tri-Level Sync Generation"
U23: library part D-263-0008, "EEPROM, 1-wire, 1024-bit, Surface Mount"
U24: library part D-220-0004, "ADC084S021, 8-bit ADC, 4 Channel, 50 ksps to 200ksps, SPI"
U26: library part D-201-0007, "PT2300, 2W x 2 Class AB Audio Power Amplifier"
U27: library part D-206-0006, "PCF2123TS, SPI Real time clock/calendar, TSSOP14"
U28: library part D-222-0004, "DAC084S085CIMM, Quad 8-bit, Single 2.7V to 5.5V rail-to-rail output"
U30: library part D-241-0024, "FPGA, Xilinx Spartan3-400 Standard Speed, BGA 1.0mm pitch, 400 balls, 0 to 85 degC"
U31 U32 U33 U34 U35: library part D-205-0004, "HEX Inverter"
U36: library part D-152-0003, "OPTOISOLATOR; SMD; Transistor output"
U39 U40 U41: library part D-204-0033, "AP1084KL, 5A Low Dropout Positive Adjustable Regulator"
U42: library part D-204-0034, "NCP630A, 3.0A Fast Linear Voltage Regulator, D2PAK"
U43 U44 U58: library part D-204-0035, "TC1017R-3.3VLTTR, 3.3V Micropower Low Dropout Regulator, 5-Pin SC70-5"
U45 U49 U60: library part D-243-0000, "MAX6315, Open-Drain Output SOT Reset IC, Customized Reset Thresholds, Timeout Delays"
U46: library part D-221-0016, "ISL8491IB, RS-485/RS-422 Transceivers"
U48: library part D-202-0006, "XPT2046, Touch Screen Controller"
U50 U51 U52 U53: library part D-262-0006
U59: library part D-221-0017, "HIN232ACBNZ-T 5V,  True RS-232 Transceivers"
U61: library part D-221-0018, "Hi-Speed Universal Serial Bus host controller"
UH1 UH2: library part D-300-0021, "Header IDC, 2 x 10 Pin Vertical 2.54mm Pitch (Non-Boxed, Male)"
VR1: library part D-105-0001, "Potentiometer, 2 x 5K Linear 9mm PCB Mount Fluted Shaft"
Y1: library part D-103-0012, "Crystal, SMD, 20.000000MHz Stab=30ppm 20.0pF"
Y2: library part D-103-0030, "Crystal, SMD, 25.000000MHz Stab=50ppm 18.0pF"
Y3: library part D-103-0031, "Crystal, 32.768 KHz Surface Mount"
Y4: library part D-103-0013, "Crystal, SMD, 24.000000MHz Stab=30ppm 20.0pF"
Y5: library part D-103-0000, "Crystal, SMD, 12.000000MHz Stab=30ppm 20.0pF"

## Free pads (board coordinates)
  rect 236.22x236.22 hole 161.42: 0(-733.79,1574.73) 0(-733.79,6052.56) 0(8413.75,6052.57) 0(8413.75,1574.73)
  round 122.05 hole 122.05 unplated: 1(-726.95,4502.25) 1(8406.91,4502.25)

## Via types
v1: diameter 23, hole 11.81, Top Layer to Bottom Layer, 3672 vias
v2: diameter 26, hole 11.81, Top Layer to Bottom Layer, 461 vias
v3: diameter 19, hole 11.81, Top Layer to Bottom Layer, tented both sides, 396 vias
v4: diameter 23.62, hole 11.81, Top Layer to Bottom Layer, 288 vias
v5: diameter 20, hole 11.81, Top Layer to Bottom Layer, 91 vias
v6: diameter 23, hole 11.81, Top Layer to Bottom Layer, tented both sides, 50 vias
v7: diameter 31, hole 11.81, Top Layer to Bottom Layer, 15 vias
v8: diameter 27.56, hole 11.81, Top Layer to Bottom Layer, tented both sides, 4 vias
v9: diameter 29, hole 11.81, Top Layer to Bottom Layer, 3 vias
v10: diameter 21, hole 11.81, Top Layer to Bottom Layer, 1 vias